# Altium PCB PCB2.PcbDoc
Units mil, origin at the board's own origin, x right, y up, seen from the top; angles counter-clockwise.
Board outline 1216.89 x 2163.11 mil, 2 copper layers (Top Layer, Bottom Layer); 17 components, 11 nets, 35 pads, 0 vias.
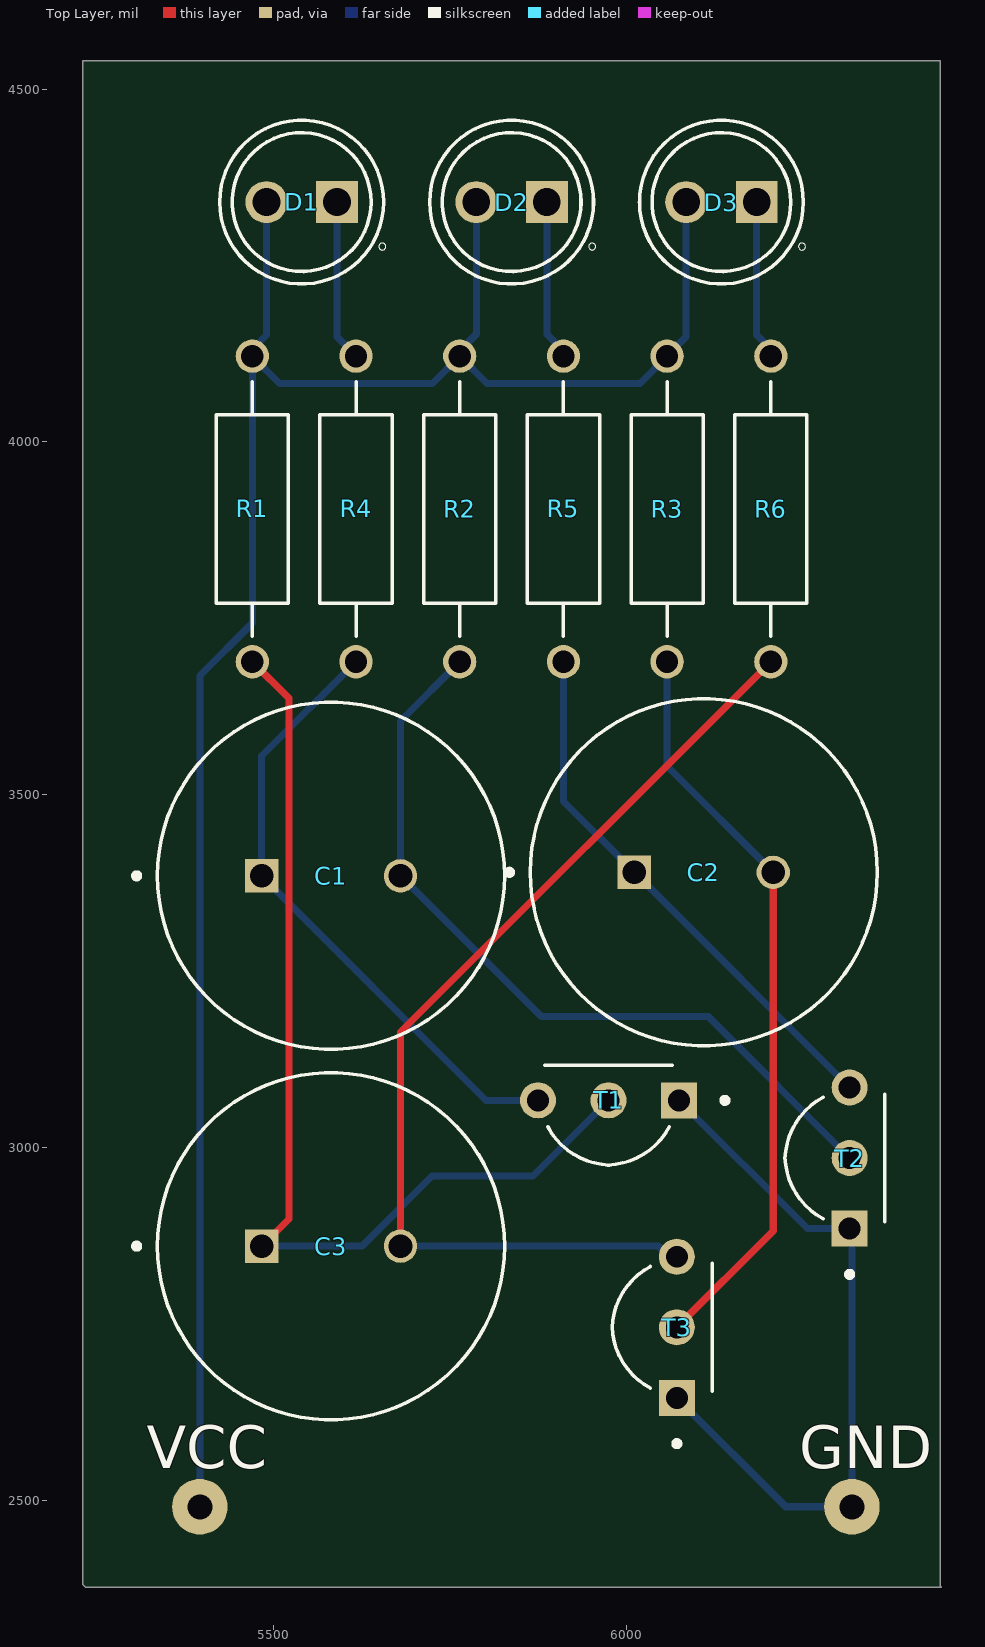
[diagram p0: Top Layer view]
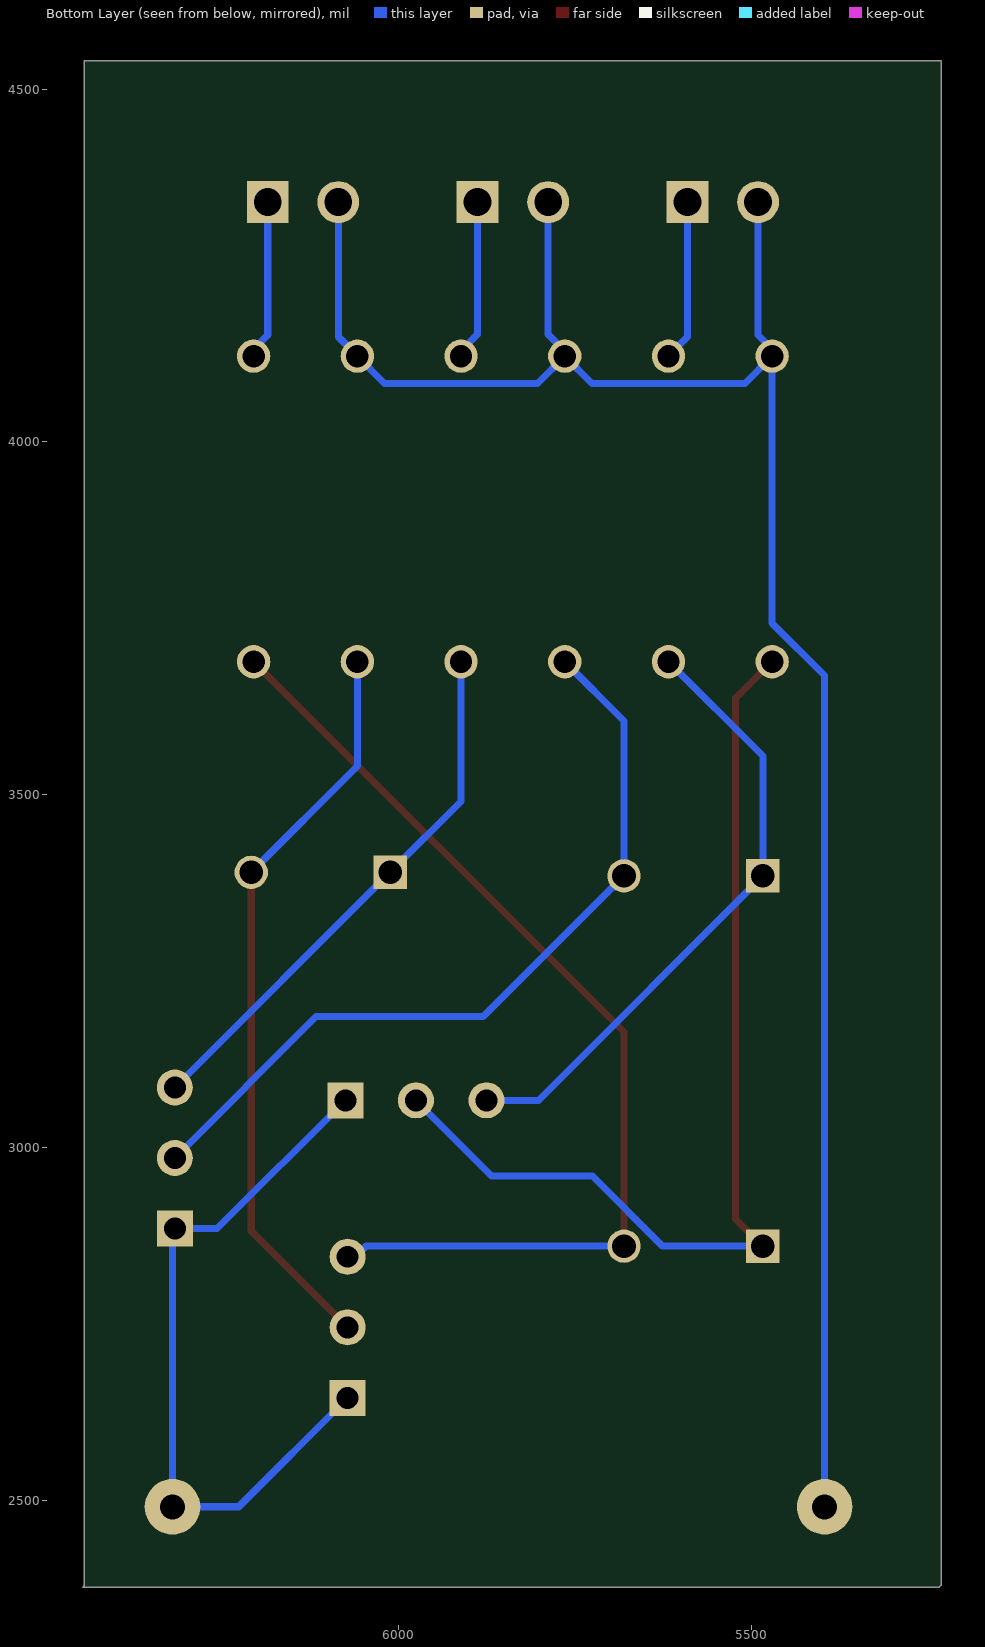
[diagram p1: Bottom Layer view, seen from below]
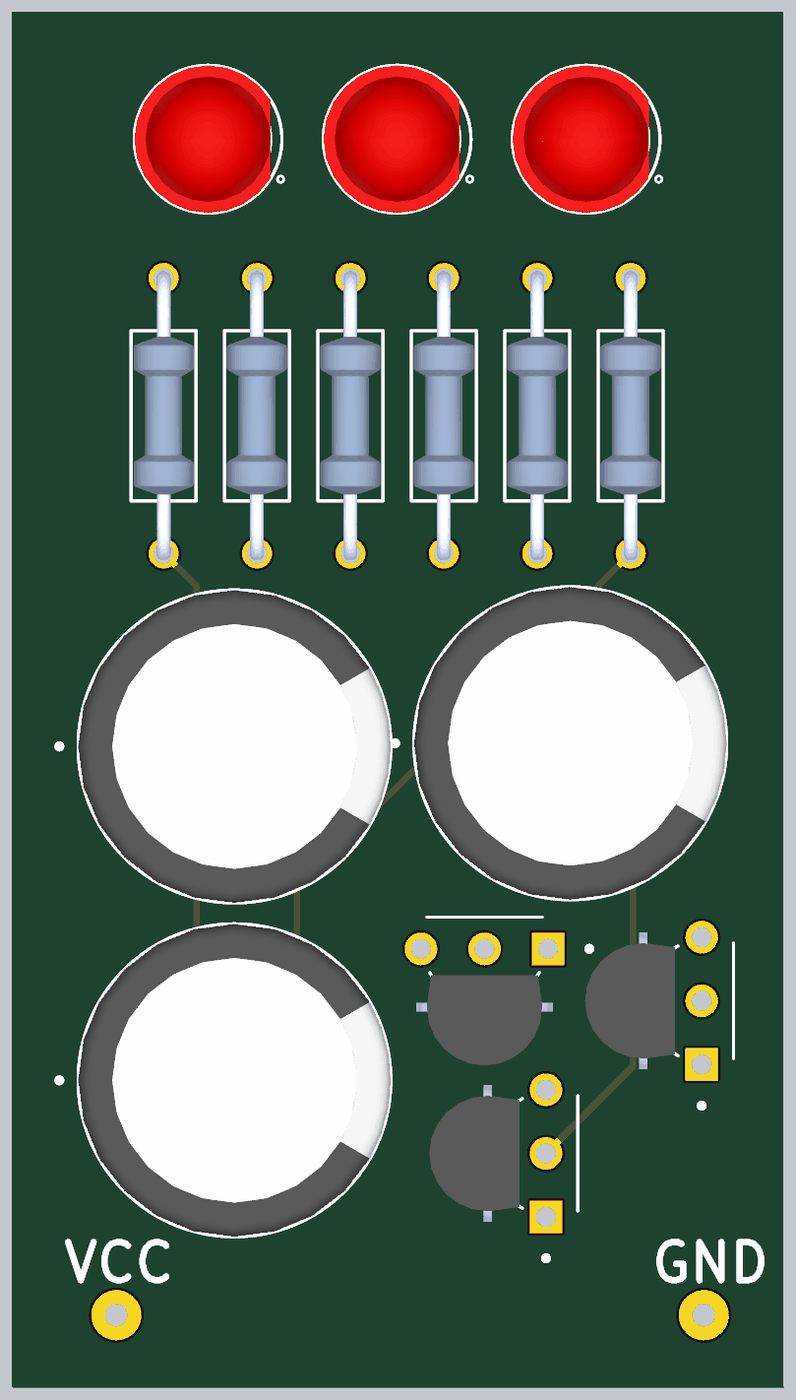
[diagram p2: 3D render of the assembled board from above, using the file's embedded part models]

## Layer stack, top to bottom
Top Solder: solder mask 0.4, Solder Resist, Dk 3.5
Top Layer: signal copper 1.4
Dielectric 1: dielectric 12.6, FR-4, Dk 4.8
Bottom Layer: signal copper 1.4
Bottom Solder: solder mask 0.4, Solder Resist, Dk 3.5

## Board outline
5230,2380 5233.11,2376.89 6446.89,2376.89 6445,2378.79 6445,4540 5230,4540

## Design rules (kind name [scope] priority, off if disabled: settings)
Clearance [All] p1: gap=10 ignorepadtopadclearanceinfootprint=FALSE
PolygonConnect [All] p1: connectstyle=Relief reliefconductorwidth=10 reliefentries=4 polygonreliefangle="90 Angle" airgapwidth=10
RoutingVias [All] p1: holewidth=28 width=50 viastyle="Through Hole" minholewidth=28 minwidth=50 maxholewidth=28 maxwidth=50
SolderMaskExpansion [All] p1: expansion=4 istentingtop=FALSE
SupplyNets "Schematic Supply Nets_1" [InNet('GND')] p1: voltage=0.000
SupplyNets "Schematic Supply Nets" [InNet('VCC')] p2: voltage=0.000
Width [All] p1: maxlimit=10 minlimit=10 preferedwidth=10
30 further rules are at their usual default settings.

## Components (designator, comment, footprint, x,y, rotation, side; value= is the part's Value field where it differs from the comment)
C1 "Capacitor" CAPACITOR 5581.57,3385 r0 top
C2 "Capacitor" CAPACITOR 6110,3390 r0 top
C3 "Capacitor" CAPACITOR 5581.57,2860 r0 top
D1 "LED" LED 5540,4340 r180 top
D2 "LED" LED 5837.5,4340 r180 top
D3 "LED" LED 6135,4340 r180 top
GND "Wire_Pad_TH" Wire_Pad_TH 6320,2490.63 r0 top (schematic designator P2)
R1 "Resistor-100K" Resistor 5470,3905 r90 top
R2 "Resistor-100K" Resistor 5764,3905 r90 top
R3 "Resistor-100K" Resistor 6058,3905 r90 top
R4 "Resistor-1K" Resistor 5617,3905 r90 top
R5 "Resistor-1K" Resistor 5911,3905 r90 top
R6 "Resistor-1K" Resistor 6205,3905 r90 top
T1 "NPN Transistor" TRANSISTOR 5975,2975 r180 top
T2 "NPN Transistor" TRANSISTOR 6225,2985 r90 top
T3 "NPN Transistor" TRANSISTOR 5980,2745 r90 top
VCC "Wire_Pad_TH" Wire_Pad_TH 5395.63,2490.63 r0 top (schematic designator P1)

## Footprints (in the part's own frame and the unit in brackets; to place one, negate y for a bottom-side part, rotate by r counter-clockwise, add the part's x,y. Pads: shape width x height; smd on the part's side, far side on the other; paste and mask are expansions set on the pad)
CAPACITOR [mm]
  round 1.2 hole 0.85: N(2.5,0)
  rect 1.2x1.2 hole 0.85: P(-2.5,0)
  silkscreen extent -7.1,-6.25 6.25,6.25, body extent -6.25,-6.25 6.25,6.25, height 20
LED [mm] "LED_WP7113ID"
  round 1.508 hole 1: A(1.27,0)
  rect 1.508x1.508 / inner round 1.508 / far side rect 1.508x1.508 hole 1: C(-1.27,0)
  silkscreen extent -3.03,-2.95 2.95,2.95, body extent -2.5,-2.95 2.95,2.95, height 9.6
Resistor [mm]
  round 1.2 hole 0.8: 1(-5.5,0) 2(5.5,0)
  silkscreen extent -4.58,-1.3 4.58,1.3, body extent -5.77,-1.2 5.77,1.2, height 2.4
TRANSISTOR [mm]
  rect 1.298x1.298 / inner round 1.298 / far side rect 1.298x1.298 hole 0.79 mask+0.102: 1(-2.54,-2.33)
  round 1.298 hole 0.79 mask+0.102: 2(0,-2.33) 3(2.54,-2.33)
  silkscreen extent -4.29,-3.6 2.3,0, body extent -2.74,-1.27 2.74,2.33, height 8.09
Wire_Pad_TH [mm]
  round 2 hole 0.9: 1(0,0)

## Part data
C1 C2 C3: "CAP ALUM 10UF 20% 450V RADIAL", Package="RADIAL-2 Panasonic", Availability="In Stock", Check_prices=https://www.snapeda.com/parts/ECA-2WM100B/Panasonic/view-part/2313535/?ref=eda, MF=Panasonic, MP=ECA-2WM100B, Price=None, Purchase-URL=https://pricing.snapeda.com/search/part/ECA-2WM100B/?ref=eda, SnapEDA_Link=https://www.snapeda.com/parts/ECA-2WM100B/Panasonic/view-part/2313535/?ref=snap
D1 D2 D3: "Red 617nm LED Indication - Discrete 2V Radial", Package="Radial Kingbright", Availability="In Stock", Check_prices=https://www.snapeda.com/parts/WP7113ID/Kingbright/view-part/?ref=eda, MF=Kingbright, MP=WP7113ID, Price=None, Purchase-URL=https://pricing.snapeda.com/search/part/WP7113ID/?ref=eda, SnapEDA_Link=https://www.snapeda.com/parts/WP7113ID/Kingbright/view-part/?ref=snap
R1 R2 R3: library part Resistor-1K, "100 kOhms Â±1% 0.25W, 1/4W Through Hole Resistor Axial - Metal Film", Package="RADIAL-2 YAGEO", Check_prices=https://www.snapeda.com/parts/MFR-25FBF52-1K/Yageo/view-part/?ref=eda, MF=Yageo, MP=MFR-25FBF52-1K, SnapEDA_Link=https://www.snapeda.com/parts/MFR-25FBF52-1K/Yageo/view-part/?ref=snap
R4 R5 R6: "1.07 kOhms Â±1% 0.25W, 1/4W Through Hole Resistor Axial - Metal Film", Package="RADIAL-2 YAGEO", Check_prices=https://www.snapeda.com/parts/MFR-25FBF52-1K/Yageo/view-part/?ref=eda, MF=Yageo, MP=MFR-25FBF52-1K, SnapEDA_Link=https://www.snapeda.com/parts/MFR-25FBF52-1K/Yageo/view-part/?ref=snap
T1 T2 T3: "BJT, TO-92, 40V, 600mA, NPN, 0.625W, 150Â°C", Package="TO-92 Diotec", Check_prices=https://www.snapeda.com/parts/2N2222A/Diotec/view-part/?ref=eda, MF="Diotec Semiconductor", MP=2N2222A, SnapEDA_Link=https://www.snapeda.com/parts/2N2222A/Diotec/view-part/?ref=snap

## Nets (pads, with @x,y where several pads share a name; then routed paths per layer and width w, separated by ;. In a path a pad name is that pad's centre, name@x,y a point inside that pad or via, vN(x,y) a via of type N, cw(c..) or ccw(c..) an arc to the next point about the centre after c; other vN are vias at no path point)
GND: GND.1 T1.1 T2.1 T3.1 | length 1024.9
  Bottom Layer w10: T3.1 6226.1,2490.63 GND.1 6320,2881.73 T2.1 6256.73,2885 T1.1
NetC1_N: C1.N R2.1 T2.2 | length 1140.7
  Bottom Layer w10: R2.1 5680,3604.46 C1.N 5879.63,3185.37 6116.36,3185.37 T2.2
NetC1_P: C1.P R4.1 T1.3 | length 882.6
  Bottom Layer w10: R4.1 5483.15,3554.61 C1.P 5801.42,3066.73 T1.3
NetC2_N: C2.N R3.1 T3.2 | length 1062.4
  Top Layer w10: T3.2 6208.43,2881.69 C2.N
  Bottom Layer w10: R3.1 6058,3540.43 C2.N
NetC2_P: C2.P R5.1 T2.3 | length 771.6
  Bottom Layer w10: R5.1 5911,3490.57 C2.P 6316.57,3085 T2.3
NetC3_N: C3.N R6.1 T3.3 | length 1443.9
  Top Layer w10: C3.N 5680,3163.46 R6.1
  Bottom Layer w10: C3.N 6045.61,2860 6060.61,2845 T3.3
NetC3_P: C3.P R1.1 T1.2 | length 1443.4
  Top Layer w10: R1.1 5521.77,3636.69 5521.77,2898.62 C3.P
  Bottom Layer w10: C3.P 5625.38,2860 5724.81,2959.43 5867.7,2959.43 T1.2
NetD1_C: D1.C R4.2 | length 229.6
  Bottom Layer w10: D1.C 5590,4149.16 5617,4122.16 R4.2
NetD2_C: D2.C R5.2 | length 228.2
  Bottom Layer w10: D2.C 5887.5,4152.66 5911,4129.16 R5.2
NetD3_C: D3.C R6.2 | length 226.7
  Bottom Layer w10: D3.C 6185,4151.61 6205,4131.61 R6.2
VCC: D1.A D2.A D3.A R1.2 R2.2 R3.2 VCC.1 | length 3005.4
  Bottom Layer w10: VCC.1 5395.63,3668.71 5470,3743.08 R1.2 ; D1.A 5490,4151.61 5470,4131.61 R1.2 ; D2.A 5787.5,4152.66 5764,4129.16 R2.2 ; D3.A@6080,4345 D3.A 6085,4149.16 6058,4122.16 R3.2 6019.38,4082.91 5802.62,4082.91 R2.2 ; R1.2 5508.62,4082.91 5725.38,4082.91 R2.2

## Silkscreen, mask and mechanical layers (free items; w line width, h text height)
Mechanical 1:
  lines w10: 5230,2380 5233.11,2376.89 6450,2376.89 6450,4540 5230,4540 5230,4495 5230,2380